# Altium PCB C19272232_PCB.PcbDoc
Units mm, origin at the board's own origin, x right, y up, seen from the top; angles counter-clockwise.
Board outline 20.92 x 20.17 mm, 2 copper layers (Top Layer, Bottom Layer), stack 0 mm thick; 1 components, 0 nets, 37 pads, 0 vias.
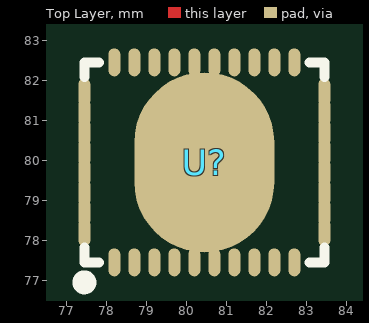
[diagram p0: Top Layer view]
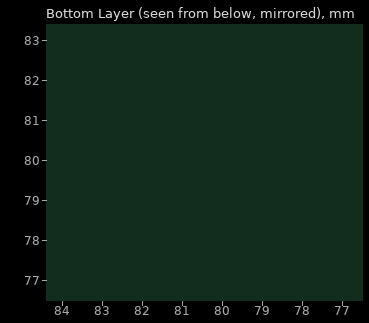
[diagram p1: Bottom Layer view, seen from below]

## Layer stack, top to bottom
Top Layer: signal copper (thickness not stored)
Bottom Layer: signal copper (thickness not stored)

## Board outline
90.769,69.85 69.85,69.85 69.85,90.015 90.769,90.015

## Design rules (kind name [scope] priority, off if disabled: settings)
PasteMaskExpansion "Paste Mask Expansion" [All] p1: expansion=0
SolderMaskExpansion "Solder Mask Expansion" [IsVia] p1: expansion=-25.4 istentingtop=TRUE
SolderMaskExpansion "Solder Mask Expansion" [All] p2: expansion=0.051 istentingtop=FALSE

## Components (designator, comment, footprint, x,y, rotation, side; value= is the part's Value field where it differs from the comment)
U? "" TQFN-36_L6.0-W5.0-P0.50-BL-EP-1 80.443,79.95 r0 top

## Footprints (in the part's own frame and the unit in brackets; to place one, negate y for a bottom-side part, rotate by r counter-clockwise, add the part's x,y. Pads: shape width x height; smd on the part's side, far side on the other; paste and mask are expansions set on the pad)
TQFN-36_L6.0-W5.0-P0.50-BL-EP-1 [mm]
  oval 0.3x0.7 smd: 1(-2.25,-2.5) 2(-1.75,-2.5) 3(-1.25,-2.5) 4(-0.75,-2.5) 5(-0.25,-2.5) 6(0.25,-2.5) 7(0.75,-2.5) 8(1.25,-2.5) 9(1.75,-2.5) 10(2.25,-2.5) 11(3,-1.75) 12(3,-1.25) 13(3,-0.75) 14(3,-0.25) 15(3,0.25) 16(3,0.75) 17(3,1.25) 18(3,1.75) 19(2.25,2.5) 20(1.75,2.5) 21(1.25,2.5) 22(0.75,2.5) 23(0.25,2.5) 24(-0.25,2.5) 25(-0.75,2.5) 26(-1.25,2.5) 27(-1.75,2.5) 28(-2.25,2.5) 29(-3,1.75) 30(-3,1.25) 31(-3,0.75) 32(-3,0.25) 33(-3,-0.25) 34(-3,-0.75) 35(-3,-1.25) 36(-3,-1.75)
  oval 3.5x4.5 smd: 37(0,0)
  silkscreen extent -3.15,-3.15 3,2.5

## Nets (pads, with @x,y where several pads share a name; then routed paths per layer and width w, separated by ;. In a path a pad name is that pad's centre, name@x,y a point inside that pad or via, vN(x,y) a via of type N, cw(c..) or ccw(c..) an arc to the next point about the centre after c; other vN are vias at no path point)
pads on no net: U?.1 U?.2 U?.3 U?.4 U?.5 U?.6 U?.7 U?.8 U?.9 U?.10 U?.11 U?.12 U?.13 U?.14 U?.15 U?.16 U?.17 U?.18 U?.19 U?.20 U?.21 U?.22 U?.23 U?.24 U?.25 U?.26 U?.27 U?.28 U?.29 U?.30 U?.31 U?.32 U?.33 U?.34 U?.35 U?.36 U?.37